# Altium PCB ESP32-S31-CoreBoard-1.PcbDoc (part 3 of 3)
Units mm, origin at the board's own origin, x right, y up, seen from the top; angles counter-clockwise.
Board outline 65 x 55 mm, 6 copper layers (SIG_0, GND_0, SIG_1, GND_1, PWR, SIG2), stack 1.578 mm thick; 144 components, 138 nets, 624 pads, 309 vias.
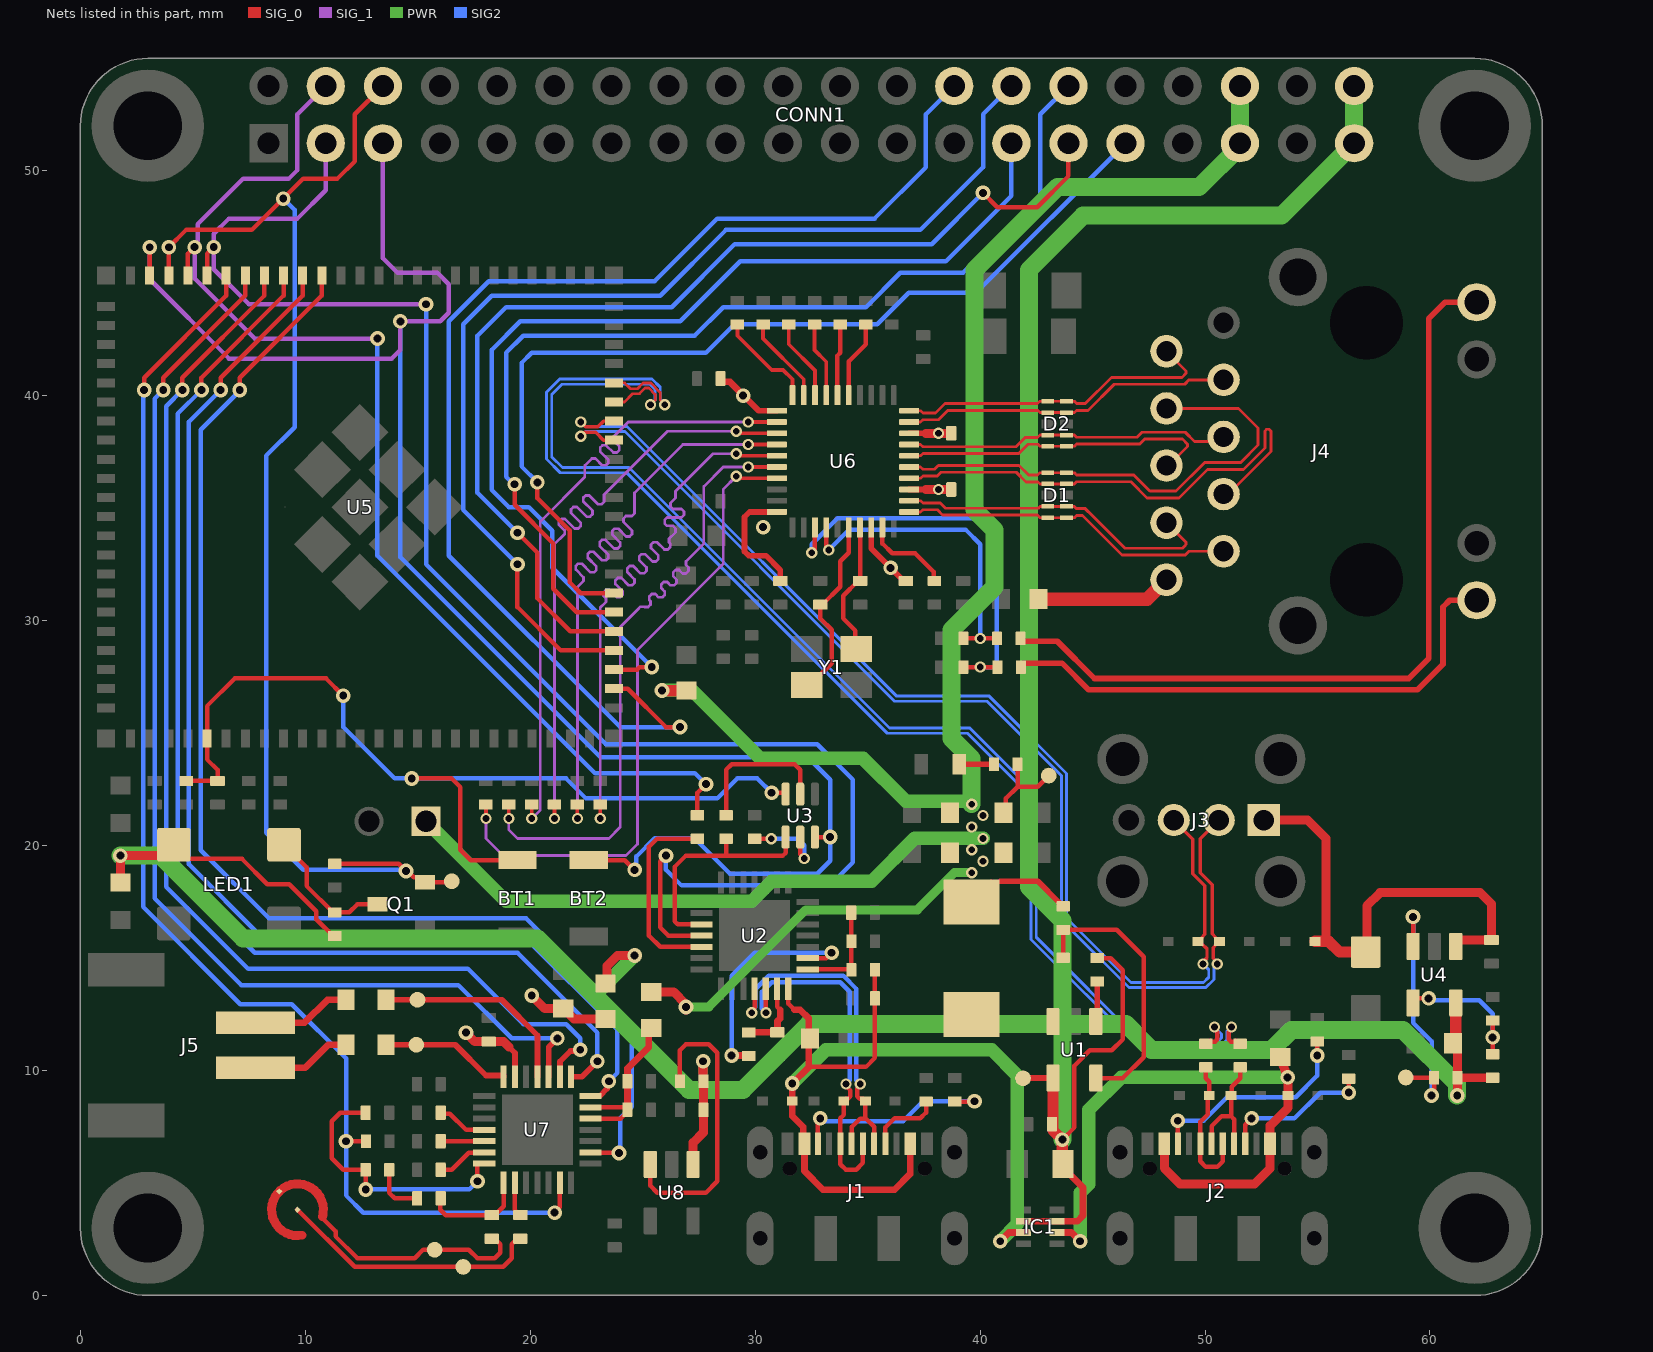
[diagram p6: the nets of this part, all layers, seen from the top]

## Via types
v1: diameter 0.5, hole 0.3, SIG_0 to SIG2, tented both sides, 152 vias
v2: diameter 0.65, hole 0.35, SIG_0 to SIG2, tented both sides, 146 vias
v3: diameter 0.65, hole 0.3, SIG_0 to SIG2, tented both sides, 9 vias
v4: diameter 0.8, hole 0.45, SIG_0 to SIG2, tented both sides, 2 vias

## Nets (pads, with @x,y where several pads share a name; then routed paths per layer and width w, separated by ;. In a path a pad name is that pad's centre, name@x,y a point inside that pad or via, vN(x,y) a via of type N, cw(c..) or ccw(c..) an arc to the next point about the centre after c; other vN are vias at no path point) (continued)
GPIO52: U5.62 U7.2 | length 57.4
  SIG_0 w0.2: v2(7.083,40.259) 7.083,40.806 10.733,44.456 U5.62@10.733,45.352 ; U7.2@22.68,6.366 22.971,6.366 22.987,6.35 v2@24.003,6.35
  SIG2 w0.2: v2(7.083,40.259) 7.083,40.23 5.346,38.493 5.346,19.8 8.382,16.764 19.812,16.764 24.511,12.065 24.511,8.382 24.003,7.874 24.003,6.395 v2(23.944,6.336)
GPIO53: U5.63 U7.7 | length 54.1
  SIG_0 w0.2: v2(6.233,40.259) 6.233,40.806 9.883,44.456 U5.63@9.883,45.352
  SIG_0 w0.254: U7.7@22.68,8.866 22.688,8.874 23.098,8.874 23.419,9.195 23.419,9.449 v2(23.495,9.525)
  SIG2 w0.2: v2(6.233,40.259) 4.826,38.852 4.826,19.177 8.047,15.956 19.731,15.956 23.876,11.811 23.876,9.906 v2(23.495,9.525)
GPIO54: U5.64 U7.8 | length 52.9
  SIG_0 w0.2: v2(5.383,40.259) 5.383,40.806 9.033,44.456 U5.64@9.033,45.352
  SIG_0 w0.254: U7.8@21.82,9.726 22.299,9.726 v2(22.987,10.414)
  SIG2 w0.2: v2(5.383,40.259) 4.318,39.194 4.318,18.669 7.75,15.237 19.434,15.237 22.987,11.684 v2(22.987,10.414)
GPIO55: U5.65 U7.9 | length 52.5
  SIG_0 w0.2: v2(4.533,40.259) 4.533,40.806 8.183,44.456 U5.65@8.183,45.352
  SIG_0 w0.254: U7.9@21.32,9.726 21.32,10.398 21.789,10.867 22.17,10.867 v2(22.225,10.922)
  SIG2 w0.2: v2(4.533,40.259) 3.81,39.536 3.81,18.161 7.452,14.519 17.231,14.519 19.698,12.052 21.603,12.052 22.225,11.43 v2(22.225,10.922)
GPIO56: U5.66 U7.10 | length 51.7
  SIG_0 w0.2: v2(3.683,40.259) 3.683,40.806 7.333,44.456 U5.66@7.333,45.352
  SIG_0 w0.254: U7.10@20.82,9.726 20.82,11.041 v2(21.209,11.43)
  SIG2 w0.2: v2(3.683,40.259) 3.302,39.878 3.302,17.653 7.154,13.801 16.806,13.801 19.177,11.43 v2(21.209,11.43)
GPIO57: R42.2 U5.67 U7.27 | length 59.4
  SIG_0 w0.2: v2(2.833,40.259) 2.833,40.806 6.483,44.456 U5.67@6.483,45.352 ; v2(11.811,6.858) R42.2@12.7,6.858 ; v2(21.082,3.683) 21.32,3.921 U7.27@21.32,5.006
  SIG2 w0.2: v2(2.833,40.259) 2.794,40.22 2.794,17.272 7.112,12.954 9.398,12.954 11.811,10.541 v2(11.811,6.858) 11.811,4.445 12.573,3.683 v2(21.082,3.683)
GPIO60: CONN1.6 Q1.2 R48.2 TP8.1 U5.70 | length 56.6
  SIG_0 w0.2: U5.70@3.933,45.352 v2(3.933,46.605) 4.699,47.371 7.62,47.371 v2(9.017,48.768) 9.906,49.657 11.43,49.657 12.192,50.419 12.192,52.51 CONN1.6@13.45,53.768 ; R48.2@11.303,19.192 14.156,19.192 v2(14.478,18.87) 14.54,18.87 14.82,18.589 15.094,18.589 Q1.2@15.319,18.364 16.459,18.364 TP8.1@16.51,18.415
  SIG_1 w0.2: v2@3.81,46.482 v2(3.933,46.605)
  SIG2 w0.2: v2(9.017,48.768) 9.525,48.26 9.525,38.608 8.255,37.338 8.255,20.574 9.906,18.923 14.425,18.923 v2(14.478,18.87)
MCU_BOOT: BT2.2 CONN1.5 U3.6 U5.71 | length 79.5
  SIG_0 w0.2: U5.71@3.083,45.352 v2(3.083,46.605) ; BT2.2@22.606,19.353 24.208,19.353 v2(24.638,18.923) ; U3.6@32.654,20.381 v2(33.335,20.381)
  SIG_1 w0.2: v2(3.083,46.605) 3.083,45.177 6.604,41.656 13.843,41.656 14.224,42.037 v2(14.224,43.307) 16.002,43.307 16.383,43.688 16.383,44.958 15.875,45.466 14.097,45.466 13.45,46.113 CONN1.5@13.45,51.228
  SIG2 w0.2: v2(14.224,43.307) 14.224,32.829 23.126,23.927 32.334,23.927 33.335,22.926 v2(33.335,20.381) 33.335,19.321 32.76,18.745 28.88,18.745 27.299,20.326 25.533,20.326 24.724,19.517 24.724,19.009 v2(24.638,18.923)
MCU_EN: BT1.2 C48.1 R46.2 U3.3 U5.5 | length 42.7
  SIG_0 w0.2: R46.2@4.699,22.875 6.094,22.875 C48.1@6.096,22.877 6.096,23.368 5.633,23.831 U5.5@5.633,24.752 5.633,26.207 6.858,27.432 10.922,27.432 v2(11.684,26.67) ; v2(14.732,22.987) 16.51,22.987 16.891,22.606 16.891,19.812 17.35,19.353 BT1.2@19.431,19.353 ; v2(30.734,22.352) 31.293,22.352 U3.3@31.354,22.291
  SIG2 w0.2: v2(11.684,26.67) 11.684,25.273 13.97,22.987 v2(14.732,22.987) 21.59,22.987 22.479,22.098 28.321,22.098 29.21,22.987 30.099,22.987 v2(30.734,22.352)
MCU_RXD0: CONN1.4 R6.1 U5.69 | length 52.8
  SIG_0 w0.2: U5.69@4.783,45.352 4.783,46.312 v2(5.08,46.609) ; R6.1@27.436,21.351 27.436,22.356 v2(27.813,22.733)
  SIG_1 w0.2: CONN1.4@10.91,53.768 9.652,52.51 9.652,50.038 9.271,49.657 7.239,49.657 5.207,47.625 5.207,46.858 5.08,46.731 v2(5.08,46.609) 5.08,45.212 7.747,42.545 v2(13.208,42.545)
  SIG2 w0.2: v2(13.208,42.545) 13.208,32.893 22.88,23.221 27.325,23.221 v2(27.813,22.733)
MCU_TXD0: CONN1.3 U2.25 U5.68 | length 74
  SIG_0 w0.2: U5.68@5.633,45.352 5.633,46.312 v2(5.93,46.609) ; v2(26.035,19.558) 25.781,19.304 25.781,16.361 26.14,16.002 U2.25@27.612,16.002
  SIG_1 w0.2: CONN1.3@10.91,51.228 10.91,49.137 9.652,47.879 6.604,47.879 5.93,47.205 v2(5.93,46.609) 5.93,45.632 7.493,44.069 v2(15.367,44.069)
  SIG2 w0.2: v2(15.367,44.069) 15.367,32.512 23.368,24.511 32.766,24.511 34.341,22.936 34.341,19.253 33.317,18.23 26.728,18.23 26.035,18.923 v2(26.035,19.558)
MDI0_N: D1.2 D1.9 J4.3 U6.2 | length 14.7
  SIG_0 w0.127: U6.2@36.849,35.334 37.357,35.334 37.456,35.236 38.226,35.236 38.462,35 42.584,35 42.663,35.079 D1.9@43.009,35.079 D1.2@43.844,35.079 44.19,35.079 44.288,34.981 44.677,34.981 44.984,34.674 46.431,33.227 46.436,33.222 48.998,33.222 49.122,33.346 49.158,33.383 49.158,33.488 J4.3@48.287,34.359
MDI0_P: D1.1 D1.10 J4.2 U6.1 | length 15
  SIG_0 w0.127: U6.1@36.849,34.834 37.357,34.834 37.456,34.932 38.1,34.932 38.336,34.696 42.545,34.696 42.663,34.579 D1.10@43.009,34.579 D1.1@43.844,34.579 44.19,34.579 44.288,34.677 44.552,34.677 44.769,34.459 46.216,33.012 46.31,32.918 49.124,32.918 49.294,33.089 J4.2@50.827,33.089
MDI1_N: D1.5 D1.6 J4.7 U6.5 | length 22.2
  SIG_0 w0.127: U6.5@36.849,36.834 37.357,36.834 37.456,36.736 37.973,36.736 38.143,36.906 41.73,36.906 42.162,36.474 42.558,36.474 42.663,36.579 D1.6@43.009,36.579 D1.5@43.844,36.579 44.19,36.579 44.288,36.481 46.829,36.481 47.546,35.763 48.717,35.763 49.987,37.033 51.587,37.033 52.361,37.807 52.361,38.571 51.493,39.439 J4.7@48.287,39.439
MDI1_P: D1.4 D1.7 J4.4 U6.4 | length 22.3
  SIG_0 w0.127: U6.4@36.849,36.334 37.357,36.334 37.456,36.432 38.099,36.432 38.269,36.603 41.604,36.603 42.036,36.171 42.571,36.171 42.663,36.079 D1.7@43.009,36.079 D1.4@43.844,36.079 44.19,36.079 44.288,36.177 46.703,36.177 47.421,35.46 48.843,35.46 50.113,36.73 51.713,36.73 52.665,37.681 52.665,38.437 52.739,38.512 52.845,38.512 52.934,38.423 52.934,37.516 51.047,35.629 J4.4@50.827,35.629
MDI2_N: D2.2 D2.9 J4.6 U6.7 | length 14.6
  SIG_0 w0.127: U6.7@36.849,37.834 37.357,37.834 37.456,37.736 41.597,37.736 42.01,38.15 42.558,38.15 42.663,38.254 D2.9@43.009,38.254 D2.2@43.844,38.254 44.19,38.254 44.288,38.156 46.97,38.156 47.192,38.378 49.125,38.378 49.53,37.973 50.631,37.973 J4.6@50.827,38.169
MDI2_P: D2.1 D2.10 J4.5 U6.6 | length 14.2
  SIG_0 w0.127: U6.6@36.849,37.334 37.357,37.334 37.456,37.432 41.722,37.432 42.136,37.846 42.571,37.846 42.663,37.754 D2.10@43.009,37.754 D2.1@43.844,37.754 44.19,37.754 44.288,37.852 47.095,37.852 47.318,38.075 48.997,38.075 49.223,37.848 49.223,37.743 48.38,36.899 J4.5@48.287,36.899
MDI3_N: D2.5 D2.6 J4.9 U6.10 | length 14.5
  SIG_0 w0.127: U6.10@36.849,39.334 37.357,39.334 37.456,39.236 38.024,39.236 38.437,39.649 42.558,39.649 42.663,39.754 D2.6@43.009,39.754 D2.5@43.844,39.754 44.19,39.754 44.288,39.656 44.679,39.656 45.841,40.818 48.971,40.818 49.157,41.004 49.157,41.109 J4.9@48.287,41.979
MDI3_P: D2.4 D2.7 J4.8 U6.9 | length 14.8
  SIG_0 w0.127: U6.9@36.849,38.834 37.357,38.834 37.456,38.932 38.15,38.932 38.563,39.346 42.571,39.346 42.663,39.254 D2.7@43.009,39.254 D2.4@43.844,39.254 44.19,39.254 44.288,39.352 44.804,39.352 45.966,40.514 49.097,40.514 49.292,40.709 J4.8@50.827,40.709
NetC13_1: C13.1 C14.1 FB2.2 U7.5 U7.6 | length 7.6
  SIG_0 w0.2: U7.5@22.68,7.866 24.024,7.866 24.188,8.03 24.286,8.03 C14.1@24.384,8.128 ; U7.6@22.68,8.366 24.196,8.366 C14.1@24.209,8.379
  SIG_0 w0.3: C14.1@24.321,8.255 C13.1@24.321,9.525 ; C13.1@24.321,9.398 24.321,10.097 25.273,11.049 FB2.2@25.273,11.938
NetC15_1: C15.1 C16.1 FB3.2 U7.13 | length 7.3
  SIG_0 w0.254: 19.05,11.049 19.32,10.779 U7.13@19.32,9.726
  SIG_0 w0.4: v2(17.145,11.684) 17.543,11.286 18.813,11.286 19.05,11.049 ; v2(20.066,13.335) 20.647,12.754 21.46,12.754 C16.1@21.463,12.751 21.513,12.751 21.713,12.551 21.713,12.515 21.947,12.281 FB3.2@23.349,12.281
NetC32_2: C32.2 U6.37 Y1.3 | length 6
  SIG_0 w0.2: Y1.3@34.501,28.74 34.461,28.78 34.461,29.547 33.909,30.099 33.909,31.105 34.571,31.767 C32.2@34.671,31.767 34.671,34.132 U6.37@34.659,34.144
NetC33_2: C33.2 U6.36 Y1.1 | length 8.3
  SIG_0 w0.2: Y1.1@32.301,27.14 32.426,27.14 33.401,28.115 33.401,29.591 32.893,30.099 C33.2@32.893,30.717 32.993,30.717 33.782,31.506 33.782,32.639 34.159,33.016 U6.36@34.159,34.144
NetC38_1: C38.1 MK1.1 TP6.1 | length 11.8
  SIG_0 w0.2: MK1.1@9.652,3.81 12.192,1.27 TP6.1@17.018,1.27 18.796,1.27 19.177,1.651 19.177,2.281 19.294,2.398 19.337,2.398 19.431,2.492 C38.1@19.431,2.54
NetC38_2: C38.2 U7.23 | length 1.6
  SIG_0 w0.2: U7.23@19.32,5.006 19.32,3.815 19.337,3.798 19.337,3.698 19.462,3.573 C38.2@19.562,3.573
NetC39_1: C39.1 MK1.2 TP7.1 | length 10.2
  SIG_0 w0.2: 10.795,3.682 10.795,3.402 11.345,2.853 11.345,2.625 12.319,1.651 14.859,1.651 15.234,2.026 15.742,2.026 TP7.1@15.748,2.032 17.272,2.032 17.653,1.651 18.415,1.651 18.669,1.905 18.669,2.281 18.552,2.398 18.517,2.398 18.415,2.5 C39.1@18.415,2.54
NetC39_2: C39.2 C40.1 U7.22 | length 4.8
  SIG_0 w0.2: C40.1@16.002,4.445 16.002,3.81 16.239,3.573 C39.2@18.292,3.573 18.292,3.679 18.311,3.698 18.557,3.698 18.82,3.961 U7.22@18.82,5.006
NetC40_2: C40.2 R40.2@13.731,5.588 | length 2.4
  SIG_0 w0.2: R40.2@13.731,5.588 13.731,4.557 13.97,4.318 C40.2@14.969,4.318
NetC41_1: C41.1 R40.1@12.685,5.588 U7.21 | length 12.1
  SIG_0 w0.2: C41.1@12.683,8.128 11.557,8.128 11.176,7.747 11.176,6.096 11.684,5.588 R40.1@12.685,5.588 v2(12.685,4.714) ; v2(17.653,5.08) 17.653,5.831 17.688,5.866 U7.21@17.96,5.866
  SIG2 w0.2: v2(12.685,4.714) 17.287,4.714 v2(17.653,5.08)
NetC44_2: C44.2 R43.1 R44.1 U2.8 | length 4.5
  SIG_0 w0.2: U2.8@32.332,14.502 34.251,14.502 R43.1@34.275,14.478 34.275,17.016 C44.2@34.273,17.018
NetD7_1: D7.1 J2.6 J2.8 R11.1 | length 5.5
  SIG_0 w0.2: J2.6@50.29,6.74 50.29,7.525 50.741,7.976 51.156,7.976 ; J2.8@51.29,6.74 51.29,7.842 51.156,7.976 ; R11.1@51.562,10.145 51.562,9.652 51.183,9.273 51.183,8.917 D7.1@51.156,8.89 51.156,7.976
NetD8_1: D8.1 J2.5 J2.7 R16.1 | length 6.4
  SIG_0 w0.2: R16.1@50.038,10.145 50.038,9.652 50.19,9.5 D8.1@50.19,8.89 50.13,8.89 50.13,8.054 49.79,7.714 J2.5@49.79,6.74 49.79,5.963 50.038,5.715 50.546,5.715 50.79,5.959 J2.7@50.79,6.74
NetJ1_3: J1.3 R8.1 | length 9.3
  SIG_0 w0.2: J1.3@32.79,6.74 32.79,7.771 v2(32.893,7.874) ; R8.1@38.866,8.621 39.736,8.621 v2(39.751,8.636)
  SIG2 w0.2: v2(32.893,7.874) 33.015,7.874 33.142,7.747 36.576,7.747 37.465,8.636 v2(39.751,8.636)
  other v2: 32.893,7.874
NetJ1_9: J1.9 R9.1 | length 3.3
  SIG_0 w0.2: J1.9@35.79,6.74 35.79,7.469 36.195,7.874 37.338,7.874 37.596,8.132 R9.1@37.596,8.621
NetJ2_3: J2.3 R17.1 | length 9.6
  SIG_0 w0.2: J2.3@48.79,6.74 v2(48.79,7.769) ; v2@54.991,10.668 v2(54.991,10.671) R17.1@54.991,11.288
  SIG2 w0.2: v2(48.79,7.769) 49.933,7.769 50.979,8.815 54.027,8.815 54.991,9.779 v2(54.991,10.671)
NetJ2_9: J2.9 R18.1 | length 6.7
  SIG_0 w0.2: J2.9@51.79,6.74 51.79,7.594 v2(52.07,7.874) ; v2@56.388,9.017 v2(56.388,9.02) R18.1@56.388,9.637
  SIG2 w0.2: v2(52.07,7.874) 53.975,7.874 55.121,9.02 v2(56.388,9.02)
  other v2: 56.388,9.02
NetJ4_11: J4.11 R34.2 | length 24
  SIG_0 w0.254: R34.2@41.813,27.94 41.813,28.015 41.911,28.113 43.642,28.113 44.831,26.924 59.436,26.924 60.579,28.067 60.579,30.607 60.881,30.909 J4.11@62.077,30.909
NetJ4_14: J4.14 R35.2 | length 36.6
  SIG_0 w0.254: R35.2@41.91,29.083 43.434,29.083 45.085,27.432 59.055,27.432 59.944,28.321 59.944,43.434 60.669,44.159 J4.14@62.077,44.159
NetL1_1: L1.1 U1.3
NetLD1_1: LD1.1 R2.2 | length 1.6
  SIG_0 w0.254: LD1.1@39.065,23.622 R2.2@40.625,23.622
NetLED1_4: LED1.4 Q1.3 R49.2 | length 6
  SIG_0 w0.2: LED1.4@9.054,20.038 10.054,19.038 10.054,18.207 11.228,17.033 11.953,17.033 12.319,17.399 Q1.3@13.208,17.399
NetR1_1: R1.1 U1.1 | length 1.8
  SIG_0 w0.254: U1.1@45.146,12.177 45.212,12.243 R1.1@45.212,13.955
NetR3_1: R3.1 R4.2 U1.5 | length 12.3
  SIG_0 w0.2: R4.2@43.688,15.016 R3.1@43.688,16.256 46.076,16.256 47.269,15.062 47.269,10.592 46.345,9.667 U1.5@45.146,9.667
NetR5_2: R5.2 U2.9 | length 10.4
  SIG_0 w0.2: U2.9@32.332,15.002 33.163,15.002 v2(33.401,15.24)
  SIG_0 w0.3: v2(28.956,10.668) 29.703,10.668 R5.2@29.718,10.653
  SIG2 w0.2: v2(28.956,10.668) 28.956,14.224 29.972,15.24 v2(33.401,15.24)
NetR6_2: R6.2 U2.26 | length 8.8
  SIG_0 w0.2: R6.2@27.436,20.305 25.639,20.305 25.273,19.939 25.273,16.002 25.773,15.502 U2.26@27.612,15.502
NetR7_2: R7.2 U3.5 | length 3.9
  SIG_0 w0.2: R7.2@29.972,20.305 v1(30.719,20.305) ; U3.5@32.004,20.381 32.004,19.609 v1(32.182,19.431)
  SIG2 w0.2: v1(30.719,20.305) 31.892,20.305 32.182,20.015 v1(32.182,19.431)
NetR10_2: R10.2 U3.2 | length 6.6
  SIG_0 w0.2: R10.2@28.706,21.351 28.706,23.372 28.956,23.622 31.75,23.622 32.004,23.368 U3.2@32.004,22.291
NetR12_1: R12.1 TP1.1 U7.14 | length 5.8
  SIG_0 w0.254: R12.1@13.589,11.144 TP1.1@14.939,11.144 16.669,11.144 18.034,9.779 18.812,9.779 18.82,9.771 U7.14@18.82,9.726
NetR13_1: R13.1 TP2.1 U7.11 | length 9.2
  SIG_0 w0.254: R13.1@13.589,13.144 TP2.1@14.986,13.144 18.733,13.144 20.32,11.557 U7.11@20.32,9.726
NetR14_2: R14.2 U6.15 | length 3.5
  SIG_0 w0.2: U6.15@34.159,40.024 34.159,41.525 34.925,42.291 R14.2@34.925,43.165
NetR15_2: R15.2 U6.16 | length 3.2
  SIG_0 w0.2: U6.16@33.659,40.024 33.659,41.787 33.782,41.91 R15.2@33.782,43.165
NetR19_1: R19.1 TP3.1 U4.3 | length 11.7
  SIG_0 w0.2: TP3.1@58.928,9.69 R19.1@60.183,9.69 60.183,9.002 v2(60.071,8.89) ; U4.3@59.248,15.517 v2(59.248,16.83)
  SIG2 w0.2: v2(59.248,16.83) 59.248,12.126 60.071,11.303 v2(60.071,8.89)
NetR20_1: R20.1 R39.2@62.789,12.22 U4.4 | length 6.5
  SIG_0 w0.2: U4.4@59.248,13.007 59.248,13.013 59.443,13.208 v2(59.944,13.208) ; R20.1@62.789,10.726 v2(62.789,11.473) R39.2@62.789,12.22
  SIG2 w0.2: v2(59.944,13.208) 60.03,13.122 62.189,13.122 62.789,12.522 v2(62.789,11.473)
NetR21_2: R21.2 U6.17 | length 3.4
  SIG_0 w0.165: R21.2@32.639,43.165 32.639,42.037 33.159,41.517 U6.17@33.159,40.024
NetR24_2: R24.2 U6.18 | length 3.6
  SIG_0 w0.165: R24.2@31.496,43.165 31.496,42.291 32.659,41.128 U6.18@32.659,40.024
NetR25_2: R25.2 U6.19 | length 3.9
  SIG_0 w0.165: R25.2@30.353,43.165 30.353,42.545 32.159,40.739 U6.19@32.159,40.024
NetR26_2: R26.2 U6.20 | length 4.5
  SIG_0 w0.165: R26.2@29.21,43.165 29.21,42.672 30.734,41.148 31.242,41.148 31.659,40.731 U6.20@31.659,40.024
NetR34_1: R34.1 R37.1 U6.33 | length 18.5
  SIG_0 w0.2: v1(32.512,33.02) 32.659,33.167 U6.33@32.659,34.144 ; R37.1@39.258,27.94 v1(40.013,27.94) R34.1@40.767,27.94
  SIG2 w0.2: v1(32.512,33.02) 32.512,33.401 33.655,34.544 39.878,34.544 40.742,33.68 40.742,28.057 40.624,27.94 v1(40.013,27.94)
NetR35_1: R35.1 R38.1 U6.34 | length 14.1
  SIG_0 w0.2: U6.34@33.159,34.144 33.159,33.262 v1(33.274,33.147) ; R38.1@39.258,29.21 v1(40.005,29.21) R35.1@40.752,29.21
  SIG2 w0.2: v1(33.274,33.147) 34.163,34.036 39.37,34.036 40.005,33.401 v1(40.005,29.21)
NetR41_1: R41.1 U8.3 | length 13.3
  SIG_0 w0.2: U8.3@25.339,5.827 25.339,4.887 25.654,4.572 27.813,4.572 28.321,5.08 28.321,10.795 27.94,11.176 26.924,11.176 26.655,10.907 R41.1@26.655,9.525
PHY_AD0: R27.2 U6.22 | length 28.8
  SIG_0 w0.165: R27.2@20.062,21.829 20.062,21.213 v1(20.066,21.209) ; v1(29.697,38.834) U6.22@30.969,38.834
  SIG_1 w0.121: v1(20.066,21.209) 20.447,21.59 20.447,34.417 22.429,36.399 22.429,36.907 22.736,37.214 22.895,37.214 23.202,36.907 23.361,36.907 23.467,37.014 23.467,37.173 23.108,37.532 23.108,37.691 23.214,37.797 23.373,37.797 23.696,37.474 23.855,37.474 23.961,37.58 23.961,37.739 23.69,38.009 23.69,38.168 24.356,38.834 24.581,38.834 28.987,38.834 28.989,38.836 29.33,38.836 29.331,38.834 v1(29.697,38.834)
PHY_AD1: R32.2 U6.27 | length 28.8
  SIG_0 w0.165: R32.2@18.03,21.829 18.03,21.213 v1(18.034,21.209) ; v1(29.159,36.424) 29.249,36.334 U6.27@30.969,36.334
  SIG_1 w0.121: v1(18.034,21.209) 18.034,20.32 18.796,19.558 24.257,19.558 24.765,20.066 24.765,28.702 28.575,32.512 28.575,35.839 v1(29.159,36.424)
PHY_AD2: R31.2 U6.26 | length 28.8
  SIG_0 w0.165: R31.2@19.046,21.829 19.046,21.213 v1(19.05,21.209) ; v1(29.697,36.834) U6.26@30.969,36.834
  SIG_1 w0.121: v1(19.05,21.209) 19.05,20.701 19.431,20.32 23.495,20.32 24.003,20.828 24.003,29.718 24.794,30.509 24.908,30.623 25.067,30.623 25.082,30.608 25.241,30.608 25.347,30.714 25.347,30.873 25.295,30.925 25.295,31.084 25.401,31.19 25.56,31.19 25.709,31.041 25.868,31.041 25.974,31.147 25.974,31.306 25.825,31.455 25.825,31.614 25.931,31.72 26.091,31.72 26.239,31.571 26.398,31.571 26.504,31.677 26.504,31.836 26.356,31.985 26.356,32.144 26.462,32.25 26.621,32.25 26.769,32.101 26.928,32.101 27.034,32.207 27.034,32.366 26.922,32.478 26.922,32.637 26.965,32.68 27.72,33.435 27.72,35.975 28.581,36.836 29.695,36.836 v1(29.697,36.834)
PHY_VDDL: C1.2 C2.2 C19.2 C20.2 C34.2 U6.3 U6.8 U6.21 U6.30 U6.38 | length 15.4
  SIG_0 w0.254: 29.87,39.624 30.16,39.334 U6.21@30.969,39.334 ; U6.30@30.969,34.834 29.754,34.834 29.53,34.61 29.53,33.081 29.718,32.893 30.48,32.893 31.115,32.258 C34.2@31.115,31.767 ; U6.38@35.159,34.144 35.159,33.211 36.603,31.767 C19.2@36.703,31.767 ; U6.3@36.849,35.834 37.595,35.834 ; U6.8@36.849,38.334 37.595,38.334
  SIG_0 w0.3: C2.2@28.465,40.767 28.465,40.693 28.54,40.618 28.876,40.618 29.464,40.03 v2(29.464,40.005) 29.489,40.005 29.87,39.624
  SIG_0 w0.4: 37.595,35.834 C20.2@38.718,35.834 ; 37.595,38.334 C1.2@38.718,38.334
  other v1: 38.156,35.834 38.156,38.334
  other v2: 36.024,32.346 30.353,34.163
PLL_OFF: R28.2 U6.23 | length 28.8
  SIG_0 w0.165: R28.2@21.078,21.829 21.078,21.213 v1(21.082,21.209) ; v1(29.159,38.424) 29.249,38.334 U6.23@30.969,38.334
  SIG_1 w0.121: v1(21.082,21.209) 21.082,33.401 21.49,33.809 21.532,33.851 21.532,34.01 21.282,34.261 21.282,34.42 21.388,34.526 21.547,34.526 21.977,34.096 22.136,34.096 22.242,34.202 22.242,34.361 21.812,34.791 21.812,34.95 21.918,35.056 22.077,35.056 22.507,34.626 22.666,34.626 22.772,34.732 22.772,34.891 22.357,35.306 22.357,35.465 22.463,35.571 22.622,35.571 23.017,35.177 23.176,35.177 23.282,35.283 23.282,35.442 23.282,35.601 25.469,37.788 26.105,38.424 v1(29.159,38.424)
R_BIAS: R33.2 U6.39 | length 3.9
  SIG_0 w0.2: U6.39@35.659,34.144 35.659,33.429 36.093,32.995 37.109,32.995 37.931,32.173 37.931,31.807 R33.2@37.973,31.765
REF_ADC: C18.1 U7.19 | length 1.9
  SIG_0 w0.2: C18.1@16.019,6.858 U7.19@17.907,6.858
REF_DAC: C36.1 U7.18 | length 2.2
  SIG_0 w0.2: C36.1@16.019,8.128 16.129,8.128 16.129,8.099 16.144,8.084 16.427,8.084 17.145,7.366 U7.18@17.907,7.366
REF_MID: C37.1 U7.20 | length 2.1
  SIG_0 w0.2: C37.1@16.002,5.588 C37.1@16.019,5.588 16.51,5.588 17.272,6.35 U7.20@17.78,6.35
RTS: R10.1 U2.24 U3.4 | length 10.3
  SIG_0 w0.2: U2.24@27.612,16.502 26.551,16.502 26.416,16.637 26.416,19.05 26.924,19.558 28.657,19.558 ; R10.1@28.706,20.305 28.706,19.607 28.657,19.558 ; U3.4@31.354,20.381 31.354,19.675 31.237,19.558 28.657,19.558
RXD_LY: R30.2 U6.25 | length 28.8
  SIG_0 w0.165: R30.2@23.11,21.829 23.11,21.213 v1(23.114,21.209) ; v1(29.159,37.424) 29.249,37.334 U6.25@30.969,37.334
  SIG_1 w0.121: v1(23.114,21.209) 23.114,30.584 23.321,30.791 23.364,30.834 23.364,30.993 23.253,31.103 23.253,31.262 23.359,31.368 23.518,31.368 23.841,31.046 24,31.046 24.106,31.152 24.106,31.311 23.783,31.634 23.783,31.793 23.889,31.899 24.048,31.899 24.371,31.576 24.53,31.576 24.636,31.682 24.636,31.841 24.313,32.164 24.313,32.323 24.42,32.429 24.579,32.429 24.901,32.106 25.06,32.106 25.166,32.212 25.166,32.371 24.844,32.694 24.844,32.853 24.95,32.959 25.109,32.959 25.431,32.637 25.59,32.637 25.696,32.743 25.696,32.902 25.374,33.224 25.374,33.383 25.48,33.489 25.639,33.489 25.961,33.167 26.12,33.167 26.226,33.273 26.226,33.432 26.173,33.484 26.173,33.643 26.456,33.926 26.456,34.043 26.456,34.103 26.344,34.216 26.09,34.216 25.977,34.328 25.977,34.478 26.09,34.59 26.725,34.59 26.837,34.703 26.837,34.853 26.725,34.965 26.344,34.965 26.232,35.078 26.232,35.228 26.344,35.34 26.456,35.453 26.456,35.754 26.77,36.068 28.126,37.424 v1(29.159,37.424)
SD_CLK: CONN1.30 U5.31 | length 46.6
  SIG_0 w0.2: v2(19.304,36.068) 19.304,35.155 21.027,33.432 21.027,31.424 22.074,30.377 U5.31@23.733,30.377
  SIG2 w0.2: v2(19.304,36.068) 19.26,36.068 18.923,36.405 18.923,41.91 19.685,42.672 27.305,42.672 28.575,43.942 34.925,43.942 36.449,45.466 39.243,45.466 42.672,48.895 42.672,52.51 CONN1.30@43.93,53.768
SD_CMD: CONN1.31 U5.32 | length 43.7
  SIG_0 w0.2: v2(20.32,36.152) 20.32,35.451 21.749,34.022 21.749,31.718 22.24,31.227 U5.32@23.733,31.227
  SIG2 w0.2: v2(20.32,36.152) 19.614,36.858 19.614,41.458 20.066,41.91 27.813,41.91 29.083,43.18 35.433,43.18 36.83,44.577 39.819,44.577 CONN1.31@46.47,51.228
SD_D0: CONN1.26 U5.27 | length 55.7
  SIG_0 w0.2: U5.27@23.733,26.977 24.331,26.977 26.035,25.273 v2(26.661,25.273)
  SIG2 w0.2: v2(26.661,25.273) 24.003,25.273 16.383,32.893 16.383,43.307 18.161,45.085 25.527,45.085 28.321,47.879 35.306,47.879 37.592,50.165 37.592,52.51 CONN1.26@38.85,53.768
SD_D1: CONN1.27 U5.28 | length 47.6
  SIG_0 w0.2: U5.28@23.733,27.827 24.751,27.827 24.864,27.94 v2(25.4,27.94)
  SIG2 w0.2: v2(25.4,27.94) 20.985,32.355 20.985,34.006 19.939,35.052 19.05,35.052 18.288,35.814 18.288,42.037 19.558,43.307 26.67,43.307 29.337,45.974 38.481,45.974 41.39,48.883 CONN1.27@41.39,51.228
SD_D2: CONN1.28 U5.29 | length 48.8
  SIG_0 w0.2: v2(19.431,32.512) 19.431,30.607 21.361,28.677 U5.29@23.733,28.677
  SIG2 w0.2: v2(19.431,32.512) 17.018,34.925 17.018,43.18 18.288,44.45 25.781,44.45 28.702,47.371 37.338,47.371 40.132,50.165 40.132,52.51 CONN1.28@41.39,53.768
SD_D3: CONN1.29 U5.30 | length 48
  SIG_0 w0.2: v2(19.431,33.909) 20.32,33.02 20.32,30.988 21.781,29.527 U5.30@23.733,29.527 ; v2(40.132,49.022) 40.767,48.387 42.545,48.387 43.93,49.772 CONN1.29@43.93,51.228
  SIG2 w0.2: v2(19.431,33.909) 17.653,35.687 17.653,42.672 18.923,43.942 26.289,43.942 29.083,46.736 37.846,46.736 v2(40.132,49.022)
SPK_N: J5.1 R13.2 | length 4.4
  SIG_0 w0.3: J5.1@7.782,12.128 9.969,12.128 10.985,13.144 R13.2@11.811,13.144
SPK_P: J5.2 R12.2 | length 4.4
  SIG_0 w0.2: J5.2@7.782,10.128 J5.2@8.668,10.128
  SIG_0 w0.3: J5.2@8.668,10.128 10.001,10.128 11.017,11.144 R12.2@11.811,11.144
TCT: C24.1 J4.1 | length 6
  SIG_0 w0.6: C24.1@42.596,30.963 47.431,30.963 J4.1@48.287,31.819
TXD_LY: R29.2 U6.24 | length 28.8
  SIG_0 w0.165: R29.2@22.094,21.829 22.094,21.213 v1(22.098,21.209) ; v1(29.697,37.834) U6.24@30.969,37.834
  SIG_1 w0.121: v1(22.098,21.209) 22.098,31.496 22.326,31.724 22.369,31.767 22.369,31.926 22.026,32.269 22.026,32.428 22.132,32.534 22.291,32.534 22.672,32.152 22.831,32.152 22.937,32.258 22.937,32.417 22.556,32.799 22.556,32.958 22.662,33.064 22.821,33.064 23.202,32.682 23.361,32.682 23.467,32.789 23.467,32.948 23.086,33.329 23.086,33.488 23.192,33.594 23.351,33.594 23.732,33.213 23.891,33.213 23.998,33.319 23.998,33.478 23.648,33.828 23.648,33.987 23.754,34.093 23.913,34.093 24.263,33.743 24.422,33.743 24.528,33.849 24.528,34.008 24.146,34.389 24.146,34.548 24.252,34.654 24.526,34.654 24.638,34.767 24.638,35.048 24.638,35.687 26.787,37.836 29.695,37.836 v1(29.697,37.834)
USB0_N: D5.1 J1.5 J1.7 U2.5 | length 16.5
  SIG_0 w0.2: U2.5@30.472,13.642 30.472,12.581 v1(30.48,12.573) ; v1(34.036,9.398) 34.036,9.317 34.237,9.116 34.237,8.853 34.12,8.736 34.034,8.736 D5.1@33.934,8.636 33.934,8.026 33.79,7.882 J1.5@33.79,6.74 33.79,5.834 34.036,5.588 34.488,5.588 34.79,5.89 J1.7@34.79,6.74
  SIG2 w0.2: v1(30.48,12.573) 30.302,12.751 30.302,13.493 30.732,13.922 33.784,13.922 34.203,13.504 34.203,9.565 v1(34.036,9.398)
USB0_P: D4.1 J1.6 J1.8 U2.4 | length 15.9
  SIG_0 w0.2: v1@29.972,12.781 U2.4@29.972,13.642 ; J1.6@34.29,6.74 34.29,7.493 34.661,7.864 34.9,7.864 ; v1(34.671,9.398) 34.671,9.317 34.538,9.184 34.538,8.848 34.65,8.736 34.8,8.736 D4.1@34.9,8.636 34.9,7.864 ; J1.8@35.29,6.74 35.29,7.499 34.925,7.864 34.9,7.864
  SIG2 w0.2: v1@29.87,12.573 29.87,12.68 29.997,12.807 29.997,13.614 30.607,14.224 33.909,14.224 34.504,13.629 34.504,9.565 v1(34.671,9.398)
  other v1: 29.845,12.573
USB1_N: R16.2 U5.42 | length 57.4
  SIG_0 w0.12: U5.42@23.733,39.727 24.193,39.727 24.558,40.092 24.857,40.092 25.107,40.342 25.273,40.342 25.552,40.063 25.552,39.802 v1(25.349,39.599)
  SIG_0 w0.2: R16.2@50.038,11.191 50.113,11.191 50.238,11.316 50.238,11.291 50.449,11.291 50.546,11.388 50.546,11.73 50.419,11.857 v1(50.419,11.938)
  SIG2 w0.127: v1(25.349,39.599) 25.552,39.802 25.552,40.284 25.324,40.513 21.405,40.513 20.955,40.063 20.955,37.28 21.431,36.805 24.384,36.805 35.966,25.222 39.541,25.222 42.494,22.269 42.494,15.926 47.168,11.252 50.533,11.252 50.736,11.455 50.736,11.62 v1(50.419,11.938)
USB1_P: R11.2 U5.43 | length 59.2
  SIG_0 w0.12: U5.43@23.733,40.577 24.193,40.577 24.456,40.314 24.765,40.314 25.015,40.564 25.365,40.564 25.774,40.155 25.774,39.809 v1(25.984,39.599)
  SIG_0 w0.2: v1(51.181,11.938) 51.181,11.857 51.054,11.73 51.054,11.388 51.151,11.291 51.362,11.291 51.362,11.316 51.502,11.176 51.562,11.176 R11.2@51.562,11.191
  SIG2 w0.127: v1(25.984,39.599) 25.984,39.656 25.781,39.859 25.781,40.379 25.418,40.742 21.311,40.742 20.726,40.157 20.726,37.186 21.336,36.576 24.289,36.576 35.872,24.994 39.446,24.994 42.266,22.174 42.266,15.831 47.073,11.024 50.628,11.024 50.965,11.361 50.965,11.722 v1(51.181,11.938)
USB_HOST_N: D9.1 J3.3 U5.41 | length 51.8
  SIG_0 w0.152: v1(22.25,38.837) 22.457,38.63 23.009,38.63 23.257,38.877 U5.41@23.733,38.877 ; J3.3@48.61,21.135 49.454,20.291 49.454,18.745 49.987,18.212 49.987,16.053 49.846,15.912 49.846,15.872 D9.1@49.722,15.748 ; D9.1@49.682,15.748 D9.1@49.722,15.748 ; v1(49.911,14.732) 49.911,14.826 50.089,15.004 50.089,15.416 49.88,15.624 49.846,15.624 D9.1@49.722,15.748
  SIG2 w0.127: v1(22.25,38.837) 22.454,38.633 24.308,38.633 36.297,26.645 40.404,26.645 43.84,23.209 43.84,16.789 46.711,13.919 49.936,13.919 50.165,14.148 50.165,14.478 v1(49.911,14.732)
USB_HOST_P: D10.1 J3.2 U5.40 | length 52.1
  SIG_0 w0.152: v1(22.25,38.202) 22.425,38.376 22.908,38.376 23.257,38.027 U5.40@23.733,38.027 ; v1(50.546,14.732) 50.546,14.817 50.368,14.995 50.368,15.468 50.484,15.584 50.484,15.624 D10.1@50.608,15.748 ; J3.2@50.61,21.135 49.784,20.309 49.784,18.796 50.317,18.263 50.317,16.079 50.484,15.912 50.484,15.872 D10.1@50.608,15.748 ; D10.1@50.648,15.748 D10.1@50.608,15.748
  SIG2 w0.127: v1(22.25,38.202) 22.454,38.405 24.213,38.405 36.202,26.416 40.31,26.416 43.612,23.114 43.612,16.695 46.616,13.691 50.031,13.691 50.394,14.053 50.394,14.58 v1(50.546,14.732)
VBUS_CDC: C12.2 D6.1 IC1.6 J2.2 J2.11 | length 28.3
  SIG_0 w0.3: IC1.6@43.412,2.798 44.065,2.798 v2(44.45,2.413)
  SIG_0 w0.4: J2.2@48.19,6.74 48.19,5.658 48.895,4.953 52.197,4.953 52.89,5.646 J2.11@52.89,6.74 52.89,7.551 53.696,8.357 D6.1@53.696,8.89 53.696,9.556 ccw(c53.296,9.556) v2(53.671,9.694) 53.414,10.392 C12.2@53.34,10.592
  PWR w0.6: v2(44.45,2.413) 44.45,4.572 44.831,4.953 44.831,8.255 46.27,9.694 v2(53.671,9.694)
VBUS_HOST: C22.2 C23.1 D11.1 J3.1 U4.1 | length 21.6
  SIG_0 w0.4: J3.1@52.61,21.135 54.557,21.135 55.372,20.32 55.372,15.748 ; C23.1@57.15,15.27 57.194,15.314 57.194,17.316 57.785,17.907 62.23,17.907 62.738,17.399 C22.2@62.738,15.803 61.193,15.803 61.148,15.758 U4.1@61.148,15.517
  SIG_0 w0.5: D11.1@54.889,15.748 55.372,15.748 55.499,15.748 55.977,15.27 C23.1@57.15,15.27
VBUS_UART: C9.2 C10.2 D3.1 IC1.3 J1.2 J1.11 R43.2 U2.7 | length 42.9
  SIG_0 w0.2: U2.7@31.472,13.642 31.472,12.978 31.75,12.7 ; 32.385,10.16 34.925,10.16 35.323,10.558 C9.2@35.323,13.208 ; C9.2@35.321,13.208 R43.2@35.321,14.478
  SIG_0 w0.3: 31.75,12.7 32.004,12.7 32.385,12.319 32.385,11.43 32.385,10.16 v2(31.648,9.423) D3.1@31.648,8.636 31.648,7.976 32.139,7.485 32.139,6.791 J1.2@32.19,6.74 32.19,5.529 33.02,4.699 36.195,4.699 36.89,5.394 J1.11@36.89,6.74 ; v2(40.894,2.413) 41.279,2.798 IC1.3@41.932,2.798
  PWR w0.6: v2(31.648,9.423) 33.147,10.922 40.513,10.922 41.656,9.779 41.656,3.175 v2(40.894,2.413)
VCC_3V3: C5.1 C6.1 C7.1 C8.1 CONN1.35 CONN1.36 FB1.1 FB2.1 J6.1 L1.2 R2.1 R3.2 TP5.1 | length 112.4
  SIG_0 w0.2: C8.1@41.046,21.463 41.146,21.562 41.146,22.096 41.671,22.621 ; R2.1@41.671,23.622 41.671,22.621 ; TP5.1@43.053,23.114 42.56,22.621 41.671,22.621
  SIG_0 w0.254: L1.2@39.624,17.486 L1.2@40.497,18.359 ; 40.896,18.415 42.575,18.415 43.515,17.475 43.515,17.4 43.613,17.302 R3.2@43.688,17.302
  SIG_0 w0.4: FB2.1@25.381,13.5 26.378,13.5 26.924,12.954 v2(26.924,12.827) v2@26.924,12.7
  SIG_0 w0.5: v2(25.857,26.899) 25.87,26.886 FB1.1@26.943,26.886
  PWR w0.4: v2(26.924,12.827) 27.94,12.827 32.258,17.145 37.211,17.145 38.862,18.796 v1(39.624,18.796) ; CONN1.36@51.55,53.768 CONN1.36@51.62,53.699
  PWR w0.6: J6.1@15.367,21.336 J6.1@15.367,21.082 18.923,17.526 29.845,17.526 30.734,18.415 35.179,18.415 37.084,20.32 v1(40.132,20.32) ; v2(25.857,26.899) 27.203,26.899 30.226,23.876 34.798,23.876 36.703,21.971 39.497,21.971 v1(39.624,21.844)
  PWR w0.8: v1(39.624,21.844) 39.624,23.876 38.735,24.765 38.735,29.591 40.64,31.496 40.64,34.036 39.751,34.925 39.751,45.593 43.434,49.276 49.742,49.276 51.55,51.084 51.55,53.629 CONN1.36@51.62,53.699
  other v1: 40.132,19.304 39.624,19.812 39.624,20.828 40.132,21.336
VCC_5V: C3.2 C4.2 C21.2 C42.1 C47.2 CONN1.39 CONN1.40 FB3.1 IC1.2 IC1.7 LED1.1 R1.2 R19.2 R20.2 R41.2 R49.1 TP4.1 U1.4 U4.5 U8.1 | length 176.5
  SIG_0 w0.2: LED1.1@4.154,20.038 4.786,19.406 7.188,19.406 8.306,18.288 9.28,18.288 10.49,17.078 10.49,16.725 11.228,15.987 R49.1@11.303,15.987 ; v2@24.384,15.113 v2(24.638,15.113) ; v2(43.656,6.929) 44.196,7.469 44.196,10.211 44.882,10.897 45.855,10.897 46.34,11.382 46.34,14.468 45.807,15.001 R1.2@45.212,15.001
  SIG_0 w0.254: TP4.1@41.925,9.667 U1.4@43.246,9.667
  SIG_0 w0.3: IC1.2@41.932,3.298 IC1.7@43.412,3.298 44.319,3.298 44.577,3.556 44.577,4.798 43.688,5.687 C4.2@43.688,5.842
  SIG_0 w0.4: C47.2@1.778,18.364 v2(1.778,19.558) 3.674,19.558 LED1.1@4.154,20.038 ; FB3.1@23.349,13.881 23.41,13.942 23.41,14.647 23.876,15.113 v2@24.384,15.113 ; U8.1@27.239,5.827 27.239,6.792 27.703,7.256 C42.1@27.703,8.255 27.703,9.523 R41.2@27.701,9.525 27.686,9.54 v2(27.686,10.414) ; C21.2@61.036,11.214 61.074,11.176 61.229,11.021 R19.2@61.229,9.69 ; v2(61.214,8.89) 61.229,8.905 R19.2@61.229,9.69 ; R20.2@62.789,9.68 61.239,9.68 R19.2@61.229,9.69
  SIG_0 w0.5: C3.2@43.246,7.62 43.246,7.339 v2(43.656,6.929) 43.656,5.874 C4.2@43.688,5.842 ; C3.2@43.246,7.769 U1.4@43.246,9.667 ; C21.2@61.074,11.176 61.148,11.25 U4.5@61.148,13.007
  PWR w0.4: 27.686,9.144 v2(27.686,10.414)
  PWR w0.6: 22.86,13.335 v2(24.638,15.113)
  PWR w0.8: v2(1.778,19.558) 3.556,19.558 7.239,15.875 20.32,15.875 22.86,13.335 27.051,9.144 27.686,9.144 29.46,9.144 32.381,12.065 46.482,12.065 47.625,10.922 52.959,10.922 53.848,11.811 58.801,11.811 61.214,9.398 v2(61.214,8.89) ; v2(43.656,6.929) 43.656,12.446 43.656,16.669 42.164,18.161 42.164,45.593 44.577,48.006 53.408,48.006 CONN1.39@56.63,51.228 CONN1.40@56.63,53.768
VDD: C11.2 R5.1 U2.6 | length 3.4
  SIG_0 w0.2: U2.6@30.988,13.716 30.988,12.827 31.115,12.7
  SIG_0 w0.3: R5.1@29.718,11.699 C11.2@30.988,11.699 ; C11.2@30.988,11.701 30.996,11.709 30.996,12.2 31.115,12.319 31.115,12.7
pads on no net: IC1.8 J1. J1.4 J1.10 J2. J2.4 J2.10 J4.17 J4.18 LED1.2 U2.1 U2.2 U2.10 U2.11 U2.12 U2.13 U2.14 U2.15 U2.16 U2.17 U2.18 U2.19 U2.20 U2.21 U2.22 U2.23 U2.27 U5.33 U5.34 U5.35 U5.36 U5.37 U5.38 U5.39 U5.91 U6.35 U7.4 U7.15 U7.24 U7.25 U7.26 U8.4

## Polygon pours and split planes (outlines as drawn)
GND on SIG_0 "NONET_L-01_P-001" (solid, pour order 7): 62.438,55 cw(c62.438,52.46) 64.978,52.46 64.978,2.54 cw(c62.438,2.54) 62.438,0 2.54,0 cw(c2.54,2.54) 0,2.54 0,52.46 cw(c2.54,52.46) 2.54,55 3.753,55
PHY_VDDL on SIG_0 "NONET_L-01_P-001" (solid, pour order 2): 30.08,34.834 30.08,34.436 30.353,34.163 30.607,33.909 30.607,33.147 31.44,32.314 31.44,31.767 31.215,31.542 31.015,31.542 30.79,31.767 30.79,32.583 30.48,32.893 29.718,32.893 29.53,33.081 29.53,34.61 29.754,34.834 30.07,34.834
GND on SIG_0 "NONET_L-01_P-001" (solid, remove dead copper, pour order 1): 62.438,55 cw(c62.438,52.46) 64.978,52.46 64.978,2.54 cw(c62.438,2.54) 62.438,0 2.54,0 cw(c2.54,2.54) 0,2.54 0,52.46 cw(c2.54,52.46) 2.54,55 3.753,55
GND on SIG_0 "NONET_L-01_P-001" (solid, pour order 0): 33.02,33.147 31.877,32.004 31.877,30.099 31.623,29.845 31.115,29.845 30.734,29.464 30.734,26.162 31.115,25.781 35.941,25.781 36.322,26.162 36.322,29.464 35.687,30.099 35.687,32.766 35.306,33.147
GND on SIG2 "NONET_L-01_P-001" (solid, remove dead copper, pour order 9): 62.399,55.113 cw(c62.399,52.573) 64.939,52.573 64.939,2.653 cw(c62.399,2.653) 62.399,0.113 2.501,0.113 cw(c2.501,2.653) -0.039,2.653 -0.039,52.573 cw(c2.501,52.573) 2.501,55.113 3.714,55.113
GND on PWR "NONET_L-01_P-001" (solid, pour order 8): 62.438,55 cw(c62.438,52.46) 64.978,52.46 64.978,2.54 cw(c62.438,2.54) 62.438,0 2.54,0 cw(c2.54,2.54) 0,2.54 0,52.46 cw(c2.54,52.46) 2.54,55 3.753,55
VCC_5V on PWR "NONET_L-01_P-001" (solid, pour order 6): 43.497,13.525 42.15,12.178 43.656,10.672 44.704,11.72 45.003,12.02
ETH_3V3 on PWR "NONET_L-01_P-001" (solid, pour order 5): 38.735,33.655 36.068,30.988 28.956,30.988 27.94,32.004 27.94,40.259 28.702,41.021 31.75,41.021 33.02,39.751 38.1,39.751 38.481,40.132 38.481,43.053 37.719,43.815 28.956,43.815 26.543,41.402 26.543,32.131 25.146,30.734 25.146,28.829 25.781,28.194 27.432,28.194 28.575,29.337 37.084,29.337 39.624,31.877 39.624,33.401 39.37,33.655 38.735,33.655 38.735,33.528
PHY_VDDL on PWR "NONET_L-01_P-001" (solid, pour order 4): 30.48,36.068 28.321,33.909 28.321,32.131 29.083,31.369 35.814,31.369 36.703,32.258 38.608,34.163 38.608,38.735 37.973,39.37 31.877,39.37 30.607,40.64 29.083,40.64 28.829,40.386 28.829,39.624 28.956,39.497 29.972,39.497 30.48,38.989
GND on SIG_1 "NONET_L-01_P-001" (solid, remove dead copper, pour order 10): 62.46,55 cw(c62.46,52.46) 65,52.46 65,2.794 cw(c62.46,2.794) 62.46,0.254 2.54,0.254 cw(c2.54,2.794) 0,2.794 0,52.46 cw(c2.54,52.46) 2.54,55 5.616,55
GND on GND_0 (split plane): 62.217,54.482 62.433,54.454 62.645,54.407 62.852,54.342 63.053,54.258 63.246,54.158 63.429,54.041 63.602,53.909 63.762,53.762 63.909,53.602 64.041,53.429 64.158,53.246 64.258,53.053 64.342,52.852 64.407,52.645 64.454,52.433 64.482,52.217 64.491,52.016 64.49,52 64.49,47.498 44.958,47.498 44.958,26.924 64.49,26.924 64.49,3 64.491,2.984 64.482,2.783 64.454,2.567 64.407,2.355 64.342,2.148 64.258,1.947 64.158,1.754 64.041,1.571 63.909,1.398 63.762,1.238 63.602,1.091 63.429,0.959 63.246,0.842 63.053,0.742 62.852,0.658 62.645,0.593 62.433,0.546 62.217,0.518 62.016,0.509 62,0.51 3,0.51 2.984,0.509 2.783,0.518 2.567,0.546 2.355,0.593 2.148,0.658 1.947,0.742 1.754,0.842 1.571,0.959 1.398,1.091 1.238,1.238 1.091,1.398 0.959,1.571 0.842,1.754 0.742,1.947 0.658,2.148 0.593,2.355 0.546,2.567 0.518,2.783 0.509,2.984 0.51,3 0.51,52 0.509,52.016 0.518,52.217 0.546,52.433 0.593,52.645 0.658,52.852 0.742,53.053 0.842,53.246 0.959,53.429 1.091,53.602 1.238,53.762 1.398,53.909 1.571,54.041 1.754,54.158 1.947,54.258 2.148,54.342 2.355,54.407 2.567,54.454 2.783,54.482 2.984,54.491 3,54.49 62,54.49 62.016,54.491
GND on GND_1 (split plane): 62.217,54.482 62.433,54.454 62.645,54.407 62.852,54.342 63.053,54.258 63.246,54.158 63.429,54.041 63.602,53.909 63.762,53.762 63.909,53.602 64.041,53.429 64.158,53.246 64.258,53.053 64.342,52.852 64.407,52.645 64.454,52.433 64.482,52.217 64.491,52.016 64.49,52 64.49,47.625 44.958,47.625 44.958,27.051 64.49,27.051 64.49,3 64.491,2.984 64.482,2.783 64.454,2.567 64.407,2.355 64.342,2.148 64.258,1.947 64.158,1.754 64.041,1.571 63.909,1.398 63.762,1.238 63.602,1.091 63.429,0.959 63.246,0.842 63.053,0.742 62.852,0.658 62.645,0.593 62.433,0.546 62.217,0.518 62.016,0.509 62,0.51 3,0.51 2.984,0.509 2.783,0.518 2.567,0.546 2.355,0.593 2.148,0.658 1.947,0.742 1.754,0.842 1.571,0.959 1.398,1.091 1.238,1.238 1.091,1.398 0.959,1.571 0.842,1.754 0.742,1.947 0.658,2.148 0.593,2.355 0.546,2.567 0.518,2.783 0.509,2.984 0.51,3 0.51,52 0.509,52.016 0.518,52.217 0.546,52.433 0.593,52.645 0.658,52.852 0.742,53.053 0.842,53.246 0.959,53.429 1.091,53.602 1.238,53.762 1.398,53.909 1.571,54.041 1.754,54.158 1.947,54.258 2.148,54.342 2.355,54.407 2.567,54.454 2.783,54.482 2.984,54.491 3,54.49 62,54.49 62.016,54.491

## Keep-outs
Keep-Out Layer:
  lines w0.254: 0,3 ccw(c3,3) 3,0 15.519,0 62,0 ccw(c62,3) 65,3 65,13.955 65,52 ccw(c62,52) 62,55 42.935,55 3,55 ccw(c3,52) 0,52 0,27.5 0,3

## Other copper
SIG_0:
  pour cut-out: 43.061,12.782 43.061,18.034 37.084,18.034 37.084,12.782
  pour cut-out: 30.837,26.187 ccw(c31.293,26.187) 31.293,25.731 35.687,25.731 ccw(c35.687,26.137) 36.092,26.137 36.092,29.642 ccw(c35.712,29.642) 35.712,30.022 ccw(c35.712,29.921) 35.712,29.821 cw(c35.712,29.642) 35.891,29.642 35.891,26.137 cw(c35.687,26.137) 35.687,25.932 31.293,25.932 cw(c31.293,26.187) 31.038,26.187 31.038,29.489 cw(c31.293,29.489) 31.293,29.745 31.725,29.745 ccw(c31.725,30.124) 32.104,30.124 32.104,31.242 ccw(c32.004,31.242) 31.904,31.242 31.904,30.124 cw(c31.725,30.124) 31.725,29.945 31.293,29.945 ccw(c31.293,29.489) 30.837,29.489
  pour cut-out: 44.958,47.498 65,47.498 65,26.924 44.958,26.924
  pour cut-out: 44.958,47.498 65,47.498 65,26.924 44.958,26.924
  region net ETH_3V3: 27.94,34.417 27.87,34.347 28.24,34.717 28.24,35.733 28.321,35.814 29.083,35.814 29.083,32.766 29.464,32.385 30.226,32.385 30.353,32.258 30.353,31.496 30.226,31.369 26.289,31.369 26.162,31.496 26.162,32.639 26.289,32.766 27.559,32.766 27.813,33.02 27.813,34.29
  region net VCC_3V3: 41.275,16.256 41.402,16.383 41.402,22.225 41.275,22.352 38.354,22.352 38.227,22.225 38.227,16.383 38.354,16.256
  region net NetL1_1: 43.541,12.422 43.181,12.782 41.447,12.782 41.275,12.954 41.275,13.716 41.148,13.843 38.1,13.843 37.973,13.716 37.973,11.176 38.1,11.049 41.148,11.049 41.275,11.176 41.275,11.43 41.417,11.572 43.246,11.572 43.541,11.867 43.541,12.177
PWR:
  region net VCC_5V: 21.746,14.449 23.974,14.449 23.974,12.221 22.178,14.017
  region net NetC15_1: 18.542,13.716 20.447,13.716 20.701,13.462 20.701,12.954 18.796,11.049 16.764,11.049 16.51,11.303 16.51,11.684 16.637,11.811
  region net VCC_3V3: 40.132,22.86 40.767,22.225 40.767,18.542 40.132,17.907 38.989,17.907 38.481,18.415 38.481,22.225 39.116,22.86
GND_1 (plane layer: these items are gaps in the copper):
  pour cut-out: 44.958,47.625 65,47.625 65,27.051 44.958,27.051
GND_0 (plane layer: these items are gaps in the copper):
  pour cut-out: 44.958,47.498 65,47.498 65,26.924 44.958,26.924

## Silkscreen, mask and mechanical layers (free items; w line width, h text height)
Top Overlay:
  lines w0.15: 7.112,48.271 57.9,48.271 ; 9.661,46.609 9.661,50.028 ; 12.201,46.609 12.201,50.028 ; 14.741,46.609 14.741,50.028 ; 17.281,46.609 17.281,50.028 ; 19.821,46.598 19.821,50.017 ; 22.361,46.609 22.361,50.028 ; 24.901,46.609 24.901,50.028 ; 27.441,46.609 27.441,50.028 ; 29.981,46.609 29.981,50.028 ; 32.521,46.609 32.521,50.028 ; 35.061,46.598 35.061,50.017 ; 37.601,46.609 37.601,50.028 ; 40.141,46.609 40.141,50.028 ; 42.681,46.609 42.681,50.028 ; 45.221,46.609 45.221,50.028 ; 47.761,46.609 47.761,50.028 ; 50.301,46.598 50.301,50.017 ; 52.841,46.609 52.841,50.028 ; 55.381,46.609 55.381,50.028 ; 57.9,46.609 41.275,46.609 7.112,46.609 7.112,49.403 7.112,50.028 57.9,50.028 ; 57.921,46.609 57.921,50.028
  text "GND" at 7.541,48.88 h0.9
  text "RXD" at 10.216,48.866 h0.9
  text "60" at 12.979,48.88 h0.9
  text "GND" at 15.169,48.88 h0.9
  text "3" at 18.313,48.88 h0.9
  text "1" at 20.853,48.866 h0.9
  text "48" at 23.139,48.88 h0.9
  text "46" at 25.679,48.88 h0.9
  text "44" at 28.219,48.866 h0.9
  text "42" at 30.759,48.866 h0.9
  text "38" at 33.299,48.88 h0.9
  text "36" at 35.839,48.88 h0.9
  text "D0" at 38.379,48.88 h0.9
  text "D2" at 40.919,48.866 h0.9
  text "CLK" at 43.205,48.88 h0.9
  text "4" at 46.253,48.866 h0.9
  text "GND" at 48.189,48.88 h0.9
  text "3.3V" at 50.882,48.88 h0.9
  text "GND" at 53.269,48.88 h0.9
  text "5V" at 56.216,48.88 h0.9
  text "GND" at 7.541,47.217 h0.9
  text "B0" at 12.979,47.217 h0.9
  text "60" at 15.519,47.229 h0.9
  text "0" at 18.059,47.229 h0.9
  text "49" at 20.599,47.229 h0.9
  text "47" at 23.139,47.229 h0.9
  text "45" at 25.679,47.229 h0.9
  text "43" at 28.219,47.229 h0.9
  text "40" at 30.759,47.229 h0.9
  text "39" at 33.299,47.229 h0.9
  text "37" at 35.839,47.229 h0.9
  text "35" at 38.379,47.229 h0.9
  text "D1" at 40.919,47.215 h0.9
  text "D3" at 43.459,47.229 h0.9
  text "CMD" at 45.618,47.217 h0.9
  text "GND" at 48.189,47.217 h0.9
  text "3.3V" at 50.882,47.217 h0.9
  text "GND" at 53.269,47.217 h0.9
  text "5V" at 56.216,47.217 h0.9
  text "TXD" at 10.216,47.204 h0.9
  text "PWR" at 37.03,24.838 h1.2
  text "RST" at 17.817,16.837 h1.2 r90
  text "BOOT" at 25.056,16.329 h1.2 r90
  text "USB UARRT" at 28.995,1.089 h1 r90
  text "USB CDC" at 56.681,1.089 h1 r90
Mechanical 13:
  lines w0.1: 72.725,1.651 94.569,1.651 ; 72.725,3.048 94.569,3.048 ; 72.725,4.445 94.569,4.445 ; 72.725,5.842 94.569,5.842 ; 72.725,7.239 94.569,7.239 ; 72.725,8.636 94.569,8.636 ; 72.725,10.033 94.569,10.033 ; 72.725,11.43 94.569,11.43 ; 72.725,12.827 94.569,12.827 ; 75.184,0.254 72.725,0.254 ; 77.724,0.254 77.724,15.621 ; 83.992,0.254 83.992,15.621 ; 72.725,0.254 72.725,15.621 94.569,15.621 ; 72.725,0.254 94.569,0.254 94.569,1.651 ; 94.569,1.651 94.569,3.048 ; 94.569,3.048 94.569,4.445 ; 94.569,4.445 94.569,5.842 ; 94.569,5.842 94.569,7.239 ; 94.569,7.239 94.569,8.636 ; 94.569,8.636 94.569,10.033 ; 94.569,10.033 94.569,11.43 ; 94.569,11.43 94.569,12.827 ; 94.569,12.827 94.569,14.224 ; 94.569,14.224 94.569,15.621 ; 94.569,14.224 72.725,14.224 94.569,14.224 ; 94.569,14.224 94.569,15.621
  text "JLC06161H-3313" at 72.925,15.833 h0.8
  text "Copper" at 79.357,14.732 h0.8
  text "Copper" at 79.357,14.732 h0.8
  text "Top" at 74.485,14.681 h0.8
  text "0.035mm" at 87.657,14.69 h0.8
  text "0.035mm" at 87.657,14.69 h0.8
  text "Prepeg" at 79.357,13.344 h0.8
  text "0.09940mm" at 87.657,13.293 h0.8
  text "Copper" at 79.357,11.938 h0.8
  text "0.0152mm" at 87.657,11.896 h0.8
  text "L2" at 74.866,11.757 h0.8
  text "0.55mm" at 87.657,10.499 h0.8
  text "0.55mm" at 87.657,10.499 h0.8
  text "Core" at 79.357,10.423 h0.8
  text "Copper" at 79.357,9.144 h0.8
  text "0.0152mm" at 87.657,9.102 h0.8
  text "L3" at 74.866,8.975 h0.8
  text "Prepeg" at 79.357,7.756 h0.8
  text "0.1088mm" at 87.657,7.705 h0.8
  text "Copper" at 79.357,6.35 h0.8
  text "0.0152mm" at 87.657,6.308 h0.8
  text "L4" at 74.866,6.169 h0.8
  text "0.55mm" at 87.657,4.911 h0.8
  text "Core" at 79.357,4.835 h0.8
  text "Copper" at 79.357,3.556 h0.8
  text "0.0152mm" at 87.657,3.514 h0.8
  text "L5" at 74.866,3.387 h0.8
  text "Prepeg" at 79.357,2.168 h0.8
  text "0.09940mm" at 87.657,2.117 h0.8
  text "Copper" at 79.357,0.762 h0.8
  text "Bottom" at 74.104,0.717 h0.8
  text "0.035mm" at 87.657,0.72 h0.8
Mechanical 15:
  circle w0.2: c62,52 r2.5
  circle w0.2: c62,52 r3
  circle w0.2: c62,3 r2.5
  circle w0.2: c62,3 r3
  circle w0.2: c3,3 r2.5
  circle w0.2: c3,3 r3
  circle w0.2: c3,52 r2.5
  circle w0.2: c3,52 r3
  circle w0.2: c3,52 r3
  circle w0.2: c3,52 r2.5
  lines w0.254: 32.5,55 65,55 ; 65,55 65,0 0,0 0,55 65,55